# Altium PCB flight controller.PcbDoc (part 2 of 3)
Units mm, origin at the board's own origin, x right, y up, seen from the top; angles counter-clockwise.
Board outline 45 x 47 mm, 6 copper layers (Top Layer, GND Layer, PWR Layer, Layer 4, Layer 5, Bottom Layer), stack 1.786 mm thick; 82 components, 123 nets, 711 pads, 295 vias.
Unrouted connection lines stored in the file: 14.
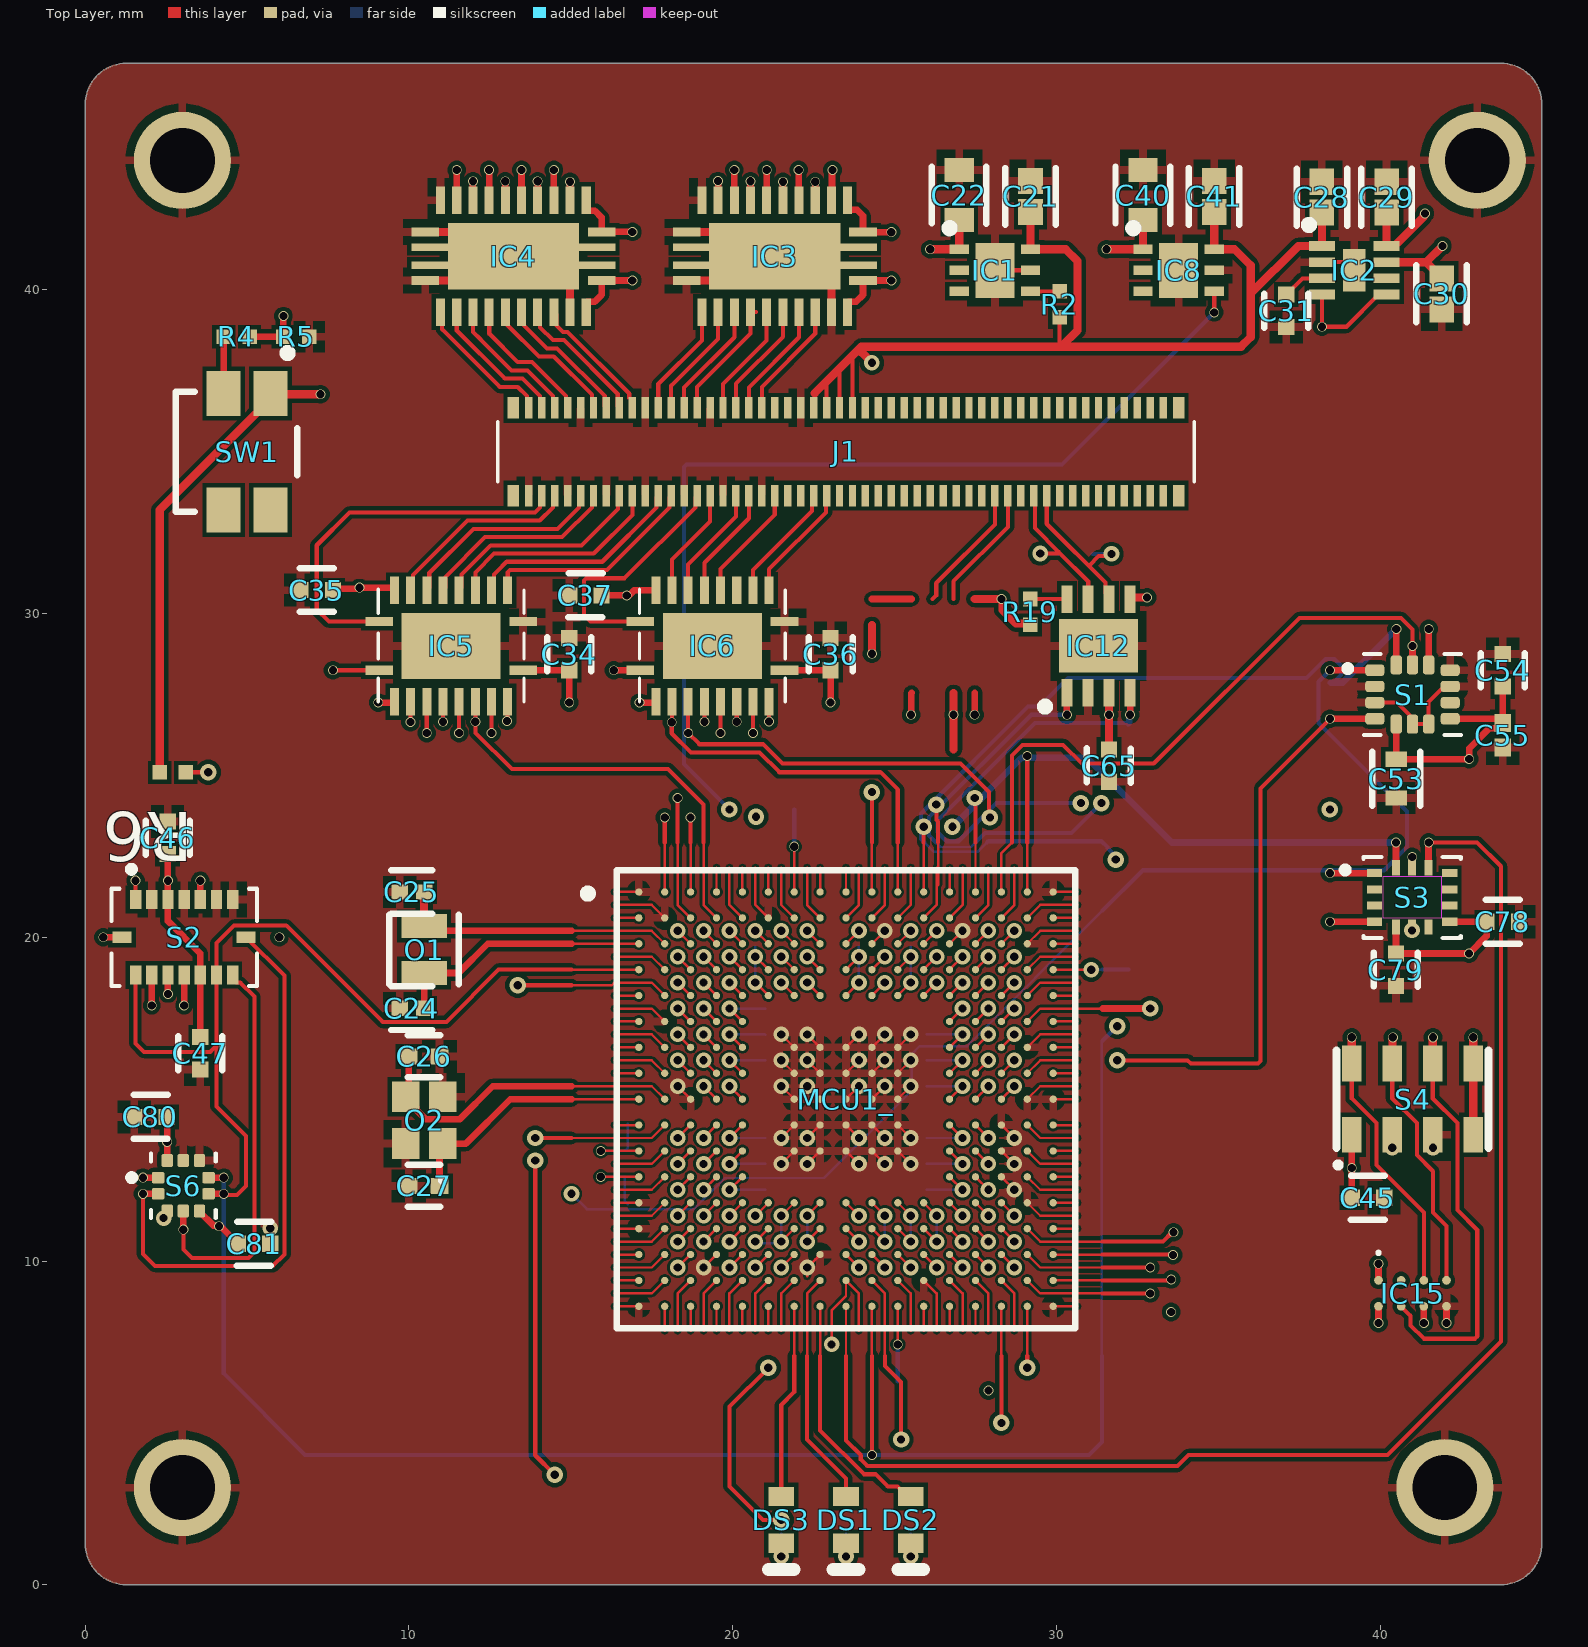
[diagram p0: Top Layer view]

## Via types
v1: diameter 0.483, hole 0.254, Top Layer to Layer 4, 88 vias
v2: diameter 0.305, hole 0.254, Top Layer to Layer 5, 60 vias
v3: diameter 0.305, hole 0.254, Top Layer to PWR Layer, 28 vias
v4: diameter 0.483, hole 0.254, Top Layer to Bottom Layer, 27 vias
v5: diameter 0.483, hole 0.254, Top Layer to GND Layer, 26 vias
v6: diameter 0.305, hole 0.254, Top Layer to Bottom Layer, 14 vias
v7: diameter 0.483, hole 0.254, Top Layer to Layer 5, 12 vias
v8: diameter 0.508, hole 0.254, Top Layer to Layer 4, 11 vias
v9: diameter 0.305, hole 0.254, Top Layer to Layer 4, 9 vias
v10: diameter 0.508, hole 0.254, Top Layer to Bottom Layer, 6 vias
v11: diameter 0.483, hole 0.254, Top Layer to PWR Layer, 6 vias
v12: diameter 0.508, hole 0.254, Top Layer to Layer 5, 4 vias
v13: diameter 0.508, hole 0.254, Top Layer to GND Layer, 3 vias
v14: diameter 0.508, hole 0.254, Top Layer to PWR Layer, 1 vias

## Nets (pads, with @x,y where several pads share a name; then routed paths per layer and width w, separated by ;. In a path a pad name is that pad's centre, name@x,y a point inside that pad or via, vN(x,y) a via of type N, cw(c..) or ccw(c..) an arc to the next point about the centre after c; other vN are vias at no path point) (continued)
IO_3V3_B: (continued)
  Top Layer w0.254: IC2.7@40.2,40.855 41.425,40.855 v3(41.925,41.355) ; 41.423,40.855 41.9,40.378 C30.1@41.9,40.355
  GND Layer w0.254: v3(16.726,30.562) 16.428,30.859 16.428,39.818 v3(16.9,40.29)
  PWR Layer w0.203: v3(16.726,30.562) 16.726,29.105 17.125,28.706 v3(17.125,27.25) v3(23.025,27.25)
  PWR Layer w0.254: v3(16.9,40.29) v3(16.9,41.79) 19.221,44.111 40.291,44.111 41.925,42.477 v3(41.925,41.355)
LED_BLUE: DS3.1 MCU1_.U7 | length 6.7
  Top Layer w0.076: 21.9,7.071 21.9,8.537 21.9,7.852
  Top Layer w0.127: DS3.1@21.5,2.725 21.5,5.55 21.9,5.95 21.9,7.071
LED_GREEN: DS2.1 MCU1_.U8 | length 7.5
  Top Layer w0.076: 22.7,7.071 22.7,7.852 MCU1_.U8@22.7,8.6
  Top Layer w0.127: 22.7,7.071 22.7,4.767 24.053,3.414 24.412,3.414 24.791,3.035 25.09,3.035 25.4,2.725 DS2.1@25.5,2.725
LED_RED: DS1.1 MCU1_.T8 | length 7.3
  Top Layer w0.076: 22.3,7.071 22.3,7.852 22.3,7.925 22.3,8.426 22.3,9 MCU1_.T8@22.7,9.4
  Top Layer w0.127: 22.3,7.071 22.3,4.486 23.5,3.286 DS1.1@23.5,2.725
NetC1_2: C1.2 MCU1_.A7 | length 2.5
  Top Layer w0.076: MCU1_.A7@21.9,21.4 v6(21.9,22.8)
  Bottom Layer w0.076: v6(21.9,22.8) v6@21.9,22.929
  Bottom Layer w0.127: v6@21.9,22.929 C1.2@21.9,23.948
NetC2_2: C2.2 MCU1_.D17 | length 2.3
  Top Layer w0.076: MCU1_.D17@29.9,19 v4(31.075,19)
  Bottom Layer w0.076: v4(31.075,19) 31.429,19
  Bottom Layer w0.127: 31.429,19 C2.2@32.223,19
NetC31_1: C31.1 IC2.3 | length 1.3
  Top Layer w0.127: C31.1@37.1,39.855 37.6,40.355 IC2.3@38.2,40.355
NetC44_2: C44.2 MCU1_.U11 | length 2.3
  Top Layer w0.076: v6(25.1,7.425) MCU1_.U11@25.1,8.6
  Bottom Layer w0.127: C44.2@25.1,6.277 v6(25.1,7.425)
NetDS1_2: DS1.2 R55.2 | length 0.7
  Bottom Layer w0.127: v4(23.5,0.875) R55.2@23.5,1.55
NetDS2_2: DS2.2 R56.2 | length 0.7
  Bottom Layer w0.127: v4(25.5,0.875) R56.2@25.5,1.55
NetDS3_2: DS3.2 R57.2 | length 0.7
  Bottom Layer w0.127: v4(21.5,0.875) R57.2@21.5,1.55
NetIC1_4: IC1.4 R2.1 | length 0.9
  Top Layer w0.127: IC1.4@29.2,39.955 R2.1@30.1,39.955
NetIC12_8: IC12.8 R19.1 | length 1.1
  Top Layer w0.127: R19.1@29.195,30.45 IC12.8@30.325,30.45
NetMCU1__E7: MCU1_.E7 R6.1 | length 27.4
  Top Layer w0.076: v7(21.5,18.6) MCU1_.E7@21.9,18.2
  Top Layer w0.127: R6.1@3.1,25.092 3.108,25.1 v13(3.8,25.1)
  GND Layer w0.076: 20.246,22.929 21.1,22.075 21.1,19 v7(21.5,18.6)
  GND Layer w0.127: v13(3.8,25.1) 4.255,24.645 18.53,24.645 20.246,22.929
  Layer 5 w0.076: v7(21.5,18.6) 21.9,19 21.9,22.075 21.9,22.4
NetR4_1: R4.1 SW1.2 | length 1.8
  Top Layer w0.203: SW1.2@4.275,36.8 R4.1@4.275,38.55
nWP_EEPROM: IC15.6 MCU1_.E4 | length 48.7
  Top Layer w0.076: v1(19.1,18.6) MCU1_.E4@19.5,18.2
  Top Layer w0.203: IC15.6@41.35,8.6 41.35,8.313 ; 41.35,8.313 v2(41.35,8.085) 41.35,8.313
  Layer 4 w0.076: 16.352,19 18.7,19 v1(19.1,18.6)
  GND Layer w0.076: 15.021,17.871 15.323,18.173 18.673,18.173 v1(19.1,18.6)
  GND Layer w0.127: 15.021,17.871 14.6,17.45 14.6,7.122 16.222,5.5 39.9,5.5 41.35,6.95 v2(41.35,8.085)
PC14_OSC32_IN: C25.1 MCU1_.C2 O1.1 | length 8.7
  Top Layer w0.076: 15.021,20.2 16.352,20.2 16.926,20.2 17.5,20.2 MCU1_.C2@17.9,19.8
  Top Layer w0.203: O1.1@10.468,20.347 10.615,20.2 15.021,20.2
  Top Layer w0.254: O1.1@10.468,20.347 C25.1@10.468,21.4
PC15_OSC32_OUT: C24.1 MCU1_.C1 O1.2 | length 8.1
  Top Layer w0.076: 15.021,19.8 16.352,19.8 16.726,19.8 MCU1_.C1@17.1,19.8
  Top Layer w0.203: C24.1@10.468,17.811 O1.2@10.468,18.897 11.532,18.897 12.435,19.8 15.021,19.8
PH0_OSC_IN: C26.2 MCU1_.J2 O2.3 | length 10.2
  Top Layer w0.076: 15.021,15.4 16.352,15.4 16.926,15.4 17.5,15.4 MCU1_.J2@17.9,15
  Top Layer w0.203: C26.2@9.993,16.32 9.993,15.177 O2.3@9.893,15.077 10.216,14.754 10.216,14.68 10.523,14.374 11.563,14.374 12.589,15.4 15.021,15.4